# Altium PCB CH32H417QEU-R1.PcbDoc (part 2 of 6)
Units mil, origin at the board's own origin, x right, y up, seen from the top; angles counter-clockwise.
Board outline 4921.26 x 3346.46 mil, 4 copper layers (Top Layer, Layer 1, Layer 2, Bottom Layer), stack 23.756 mil thick; 271 components, 257 nets, 1065 pads, 927 vias.
Unrouted connection lines stored in the file: 149.
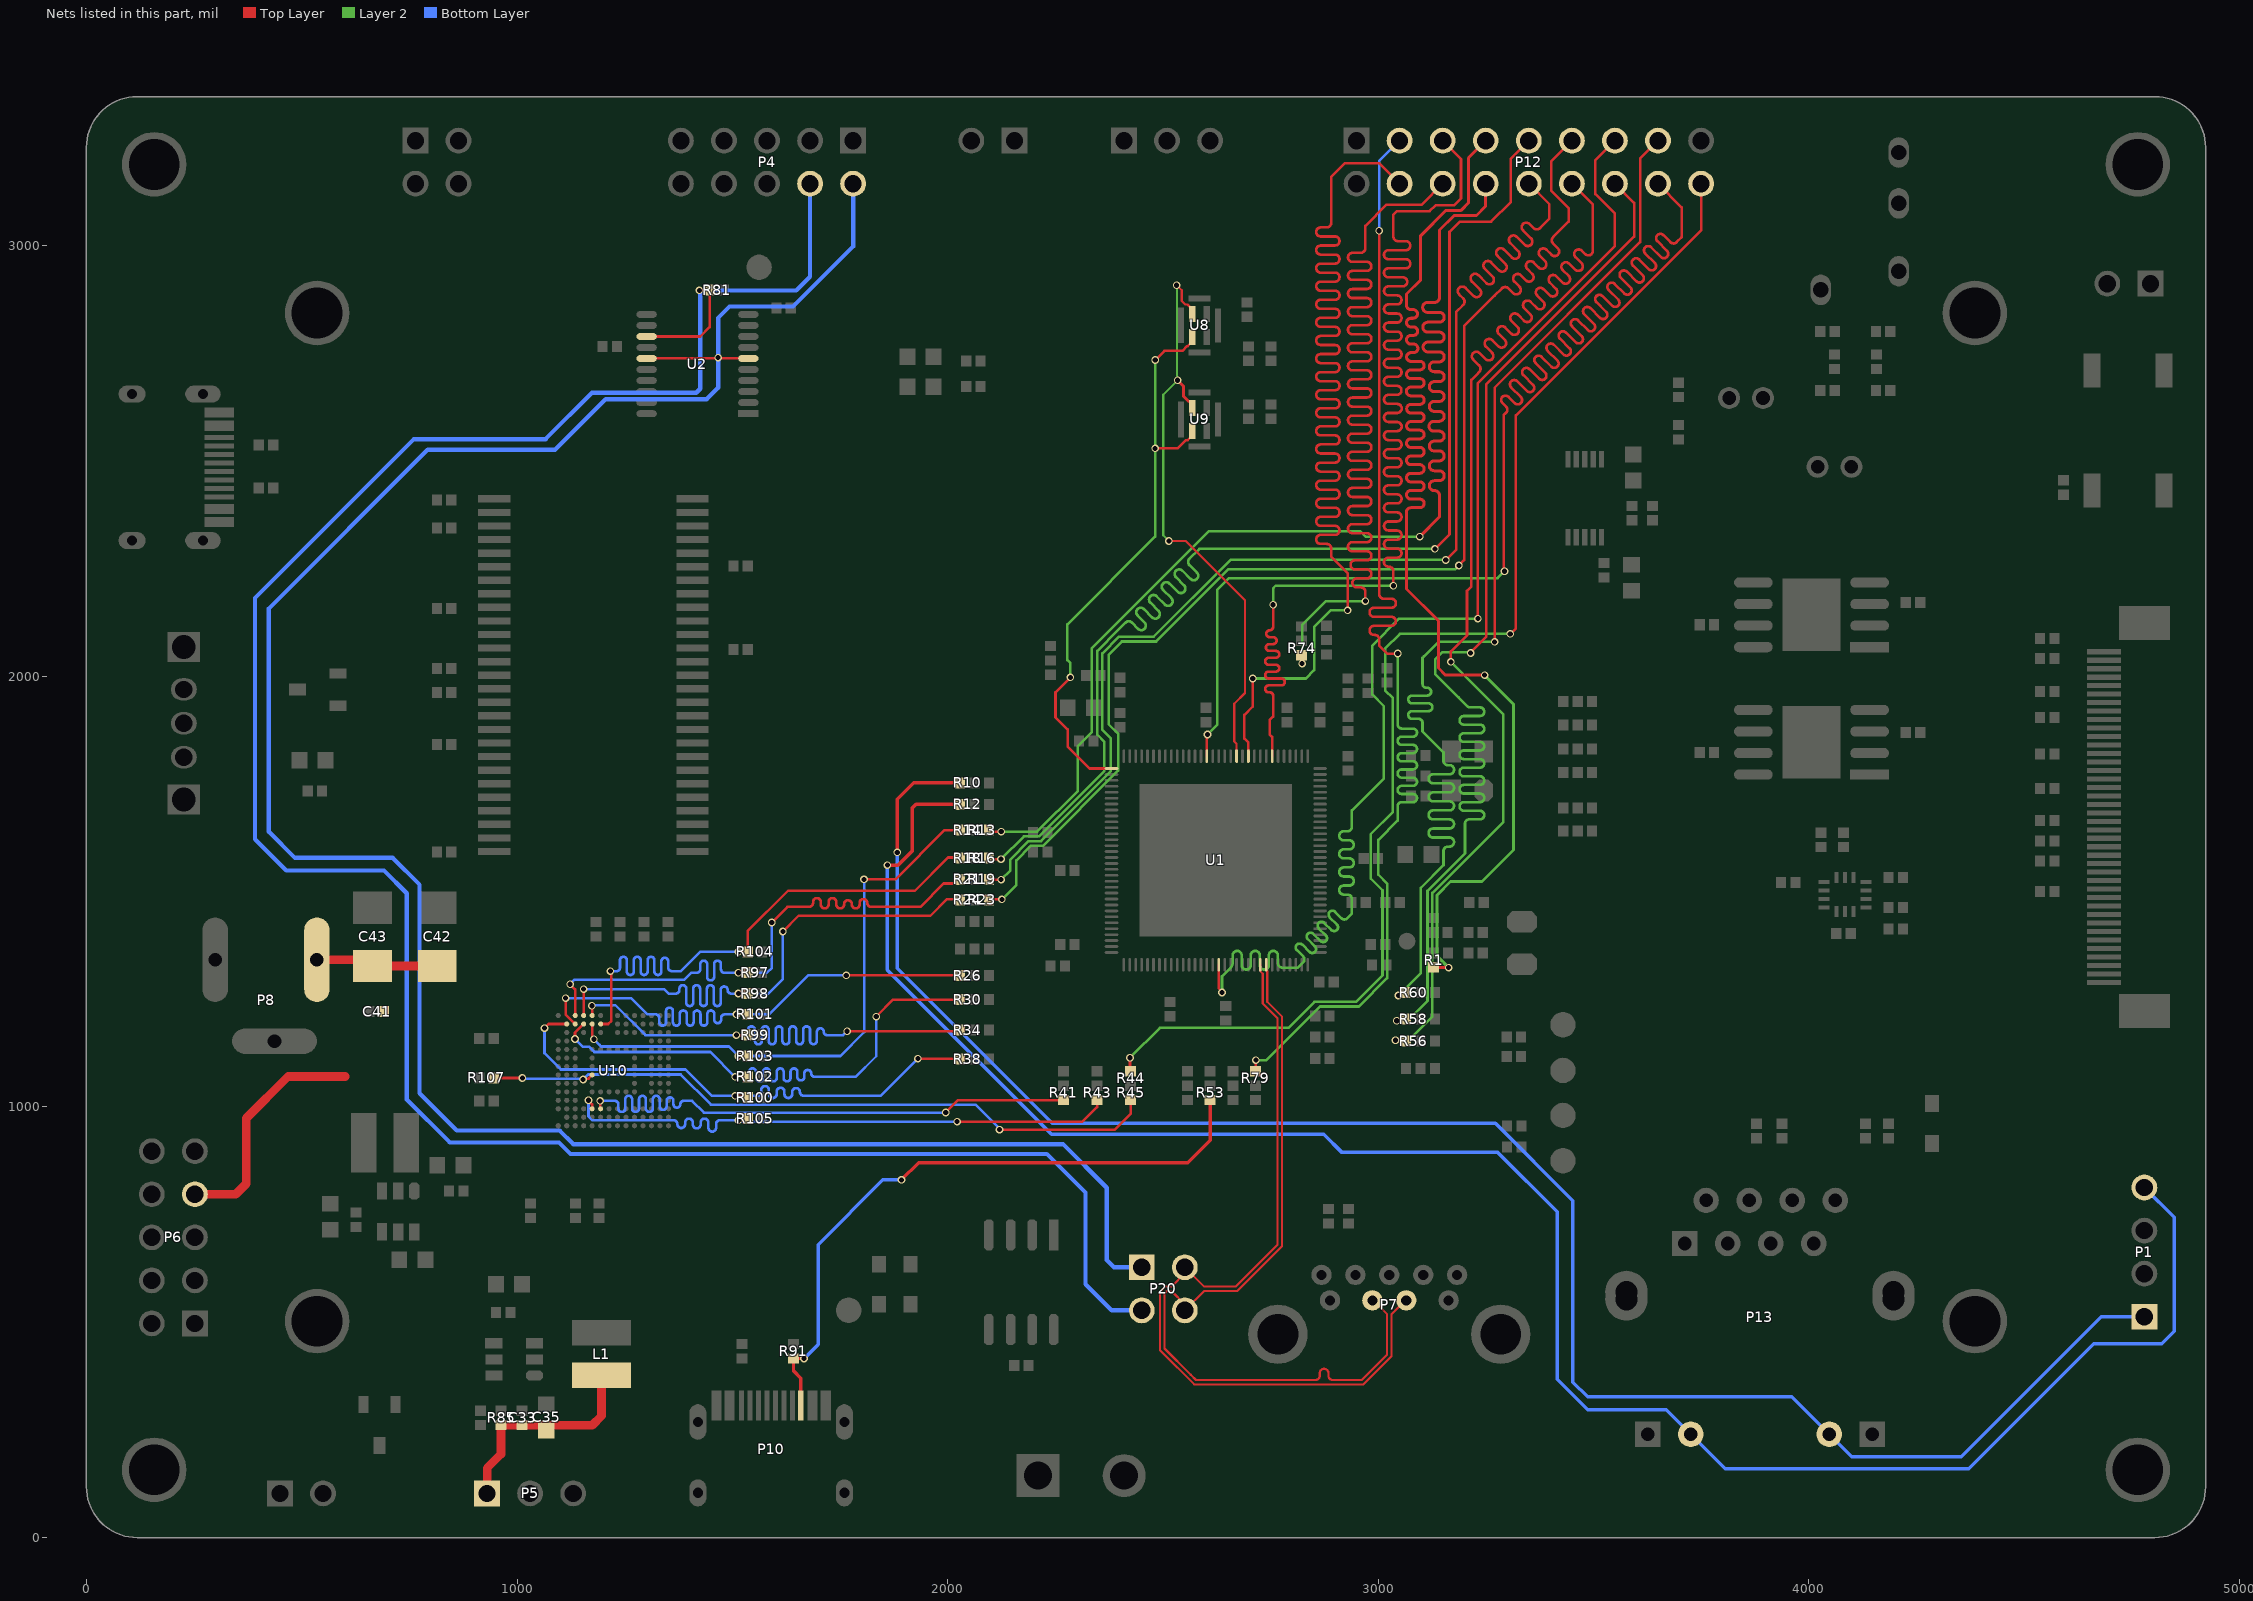
[diagram p4: the nets of this part, all layers, seen from the top]

## Via types
v1: diameter 17.72, hole 11.81, Top Layer to Bottom Layer, tented both sides, 558 vias
v2: diameter 19.68, hole 11.81, Top Layer to Bottom Layer, tented both sides, 320 vias
v3: diameter 28, hole 16, Top Layer to Bottom Layer, tented both sides, 24 vias
v4: diameter 20, hole 12, Top Layer to Bottom Layer, tented both sides, 22 vias
v5: diameter 27.56, hole 15.75, Top Layer to Bottom Layer, tented both sides, 3 vias

## Nets (pads, with @x,y where several pads share a name; then routed paths per layer and width w, separated by ;. In a path a pad name is that pad's centre, name@x,y a point inside that pad or via, vN(x,y) a via of type N, cw(c..) or ccw(c..) an arc to the next point about the centre after c; other vN are vias at no path point) (continued)
CC2: P10.B5 R53.1 R91.1 | length 1523
  Top Layer w8: P10.B5@1658.98,306.76 1658.98,370.51 1642,387.49 R91.1@1642,416 v1(1666.57,416) ; v1(1892.75,830.83) 1932.66,870.75 2557.72,870.75 2609.77,922.79 R53.1@2609.77,1016.02
  Bottom Layer w8: v1(1666.57,416) 1699.1,448.52 1699.1,680.41 1849.52,830.83 v1(1892.75,830.83)
CLK: P7.3 P20.2 U1.120 | length 1908.2
  Top Layer w5.1: U1.120@2726.04,1330.38 2726.26,1330.16 2726.26,1314.99 2731.87,1309.38 2731.87,1240.35 2766,1206.22 2766,680.24 2668.59,582.83 2595.75,582.83 P20.2@2550.8,627.78 2550.8,613.81 2519.83,582.83 2505.19,582.83 2496.39,574.02 2493.43,571.06 2493.43,435.15 2496.39,432.19 2572.7,355.88 2965.51,355.88 3030.68,421.05 3030.68,518.62 3063.06,551 P7.3@3065,551
D_SWCLK: P4.2 P20.1 U2.6 U2.15 | length 5528.4
  Top Layer w6: U2.15@1300.92,2738.17 1301.97,2739.22 1465.94,2739.22 v1(1466.99,2740.26) 1468.04,2739.22 1536.11,2739.22 U2.6@1537.16,2738.17
  Bottom Layer w10: P4.2@1780.53,3142.48 1780.53,2998.27 1641.01,2858.76 1493.56,2858.76 1466.99,2832.19 v1(1466.99,2740.26) 1466.99,2670.43 1440.28,2643.72 1205.74,2643.72 1088.31,2526.29 792.45,2526.29 423.71,2157.55 423.71,1639.18 484.43,1578.47 711.31,1578.47 773.42,1516.36 773.42,1032.04 859.96,945.5 1098.92,945.5 1130.64,913.78 2268.08,913.78 2369.57,812.29 2369.57,644.54 2386.33,627.78 P20.1@2450.8,627.78
D_SWDIO: P4.4 P20.3 R81.1 U2.13 | length 5690.4
  Top Layer w6: U2.13@1300.92,2789.27 1425.49,2789.26 1447.13,2810.88 R81.1@1447.13,2896.76 1446.68,2896.31 v1(1423.54,2896.31)
  Bottom Layer w10: P4.4@1680.53,3144.09 1680.53,2928.2 1648.64,2896.31 1425.5,2896.31 1425.5,2668.09 1416.17,2658.76 1174.27,2658.76 1066.44,2550.93 760.41,2550.93 391.33,2181.85 391.33,1621.98 464.19,1549.12 691.07,1549.12 744.04,1496.16 744.04,1017.59 844.01,917.62 1097.35,917.62 1123.98,890.99 2230.5,890.99 2320.15,801.34 2320.15,588.39 2380.76,527.78 P20.3@2450.8,527.78
DC_3V3: C33.1 C35.2 L1.2 P5.1 R85.1 | length 508.3
  Top Layer w20: P5.1@930.43,102.71 930.43,161.53 962.88,193.98 R85.1@962.88,261.16 C33.1@1012,261.16 1061.12,261.16 1174.59,261.16 1196.12,282.69 L1.2@1196.12,376.95
DC_5V: C41.2 C42.2 C43.2 P6.7 P8.1 | length 842
  Top Layer w20: P6.7@254.28,793.57 258.09,797.38 347.1,797.38 371.39,821.68 371.39,973.92 468.4,1070.93 600.9,1070.93 ; P8.1@535.24,1341.89 650.07,1341.89 C43.2@664.56,1327.4 C42.2@814.56,1327.4 819.06,1327.4 C42.2@820.08,1326.39
DFS_CLK: U1.45 U8.3 U9.3 | length 1387.9
  Top Layer w5: v1(2513.65,2314.42) 2552.78,2314.42 2690.34,2176.86 2690.34,1961.53 2665.59,1936.77 2665.59,1848.59 2670.92,1843.26 U1.45@2670.92,1814.64 ; v1(2531.87,2908.28) 2543.66,2896.49 2543.66,2871.86 2551.93,2863.6 2557.07,2863.6 2568.27,2852.4 U8.3@2568.27,2841.57
  Top Layer w7: v1(2533.98,2687.59) 2547.18,2674.38 2547.18,2651.33 2560.17,2638.35 2563.89,2638.35 2568.27,2633.98 U9.3@2568.27,2623.15
  Layer 2 w5: v1(2513.65,2314.42) 2500.68,2327.39 2500.68,2654.29 v1(2533.98,2687.59) 2532.93,2688.64 2532.93,2907.23 v1(2531.87,2908.28)
DFS_DOUT: U1.65 U8.4 U9.4 | length 1354.2
  Top Layer w6: v1(2285.02,1997.58) 2250.39,1962.95 2250.39,1905.03 2278.65,1876.76 2278.65,1837.16 2329.72,1786.09 U1.65@2380.56,1786.09 ; v1(2481.95,2529.44) 2534.1,2529.44 2553.13,2548.47 2557.57,2548.47 2568.27,2559.17 U9.4@2568.27,2570 ; v1(2482.18,2734.64) 2503.5,2755.97 2545.17,2755.97 2556.1,2766.9 2557.57,2766.9 2569.2,2778.53 U8.4@2569.2,2784.28
  Layer 2 w6: v1(2285.02,1997.58) 2285.02,2030.63 2278.12,2037.54 2278.12,2120.65 2481.95,2324.48 v1(2481.95,2529.44) ; v1@2482.06,2529.55 2482.06,2734.53 v1(2482.18,2734.64)
DIO: P7.2 P20.4 U1.121 | length 1908.2
  Top Layer w5.1: U1.121@2739.81,1330.38 2739.81,1317.46 2741.97,1315.3 2741.97,1244.54 2776.1,1210.41 2776.1,676.05 2672.78,572.73 2595.75,572.73 P20.4@2550.8,527.78 2550.8,541.75 2519.83,572.73 2509.38,572.73 2503.53,566.88 2503.53,439.34 2564.62,378.25 2576.88,365.98 2800.21,365.98 2854.12,365.98 ccw(c2854.12,376.03) 2864.17,376.03 2864.17,382.06 cw(c2874.22,382.06) 2884.27,382.06 2884.27,376.03 ccw(c2894.32,376.03) 2894.32,365.98 2916.97,365.98 2961.33,365.98 3020.58,425.23 3020.58,518.62 2988.2,551 P7.2@2986.26,551
DVP_D0: P12.8 R13.1 | length 2949.6
  Top Layer w6: R13.1@2095.96,1642.71 2099.28,1639.4 v1(2124.41,1639.4)
  Top Layer w7: v1(3096.28,2324.46) 3142.18,2370.37 3142.18,2416.4 3142.18,2419.9 ccw(c3130.68,2419.9) 3130.68,2431.4 3130.07,2431.4 cw(c3130.07,2442.9) 3130.07,2454.4 3141.75,2454.4 ccw(c3141.75,2465.9) 3141.75,2477.4 3130.07,2477.4 cw(c3130.07,2488.9) 3130.07,2500.4 3141.75,2500.4 ccw(c3141.75,2511.9) 3141.75,2523.4 3130.07,2523.4 cw(c3130.07,2534.9) 3130.07,2546.4 3141.75,2546.4 ccw(c3141.75,2557.9) 3141.75,2569.4 3129.51,2569.4 cw(c3129.51,2580.9) 3129.51,2592.4 3141.75,2592.4 ccw(c3141.75,2603.9) 3141.75,2615.4 3130.07,2615.4 cw(c3130.07,2626.9) 3130.07,2638.4 3141.75,2638.4 ccw(c3141.75,2649.9) 3141.75,2661.4 3130.07,2661.4 cw(c3130.07,2672.9) 3130.07,2684.4 3141.75,2684.4 ccw(c3141.75,2695.9) 3141.75,2707.4 3130.07,2707.4 cw(c3130.07,2718.9) 3130.07,2730.4 3141.75,2730.4 ccw(c3141.75,2741.9) 3141.75,2753.4 3115.5,2753.4 cw(c3115.5,2764.9) 3115.5,2776.4 3141.75,2776.4 ccw(c3141.75,2787.9) 3141.75,2799.4 3114.89,2799.4 cw(c3114.89,2810.9) 3114.89,2822.4 3141.75,2822.4 ccw(c3141.75,2833.9) 3141.75,2845.4 3114.54,2845.4 cw(c3114.54,2856.9) 3114.54,2868.4 3130.68,2868.4 ccw(c3130.68,2879.9) 3142.18,2879.9 3142.18,2926.78 3142.18,3036.34 3176.26,3070.42 3228.13,3070.42 3248.69,3090.98 P12.8@3248.69,3144.09
  Layer 2 w6: v1(2124.41,1639.4) 2207.62,1639.4 2302.39,1734.17 2302.39,1838.03 2334.82,1870.47 2334.82,2065.52 2606.11,2336.8 2958.31,2336.8 2970.65,2324.46 v1(3096.28,2324.46)
DVP_D1: P12.9 R16.1 | length 2977.8
  Top Layer w6: R16.1@2095.96,1577.71 2098.17,1575.5 v1(2123.99,1575.5) ; v1(3131.5,2296.11) 3165.33,2329.93 3165.33,3032.22 3189.28,3056.16 3262.28,3056.16 3307.89,3101.78 3307.89,3202.38 P12.9@3349.61,3244.09
  Layer 2 w6: v1(2123.99,1575.5) 2176.89,1628.4 2212.17,1628.4 2363.92,1780.15 2363.92,1848.04 2347.51,1864.45 2347.51,2059.27 2396.05,2107.82 2413.02,2124.79 cw(c2420.45,2117.36) 2427.87,2124.79 2442.19,2110.47 ccw(c2449.61,2117.9) 2457.04,2110.47 ccw(c2449.61,2117.9) 2457.04,2125.32 2441.04,2141.33 cw(c2448.46,2148.75) 2441.04,2156.17 cw(c2448.46,2148.75) 2455.89,2156.17 2474.86,2137.2 ccw(c2482.28,2144.63) 2489.71,2137.2 ccw(c2482.28,2144.63) 2489.71,2152.05 2470.73,2171.02 cw(c2478.16,2178.45) 2470.73,2185.87 cw(c2478.16,2178.45) 2485.58,2185.87 2504.56,2166.9 ccw(c2511.98,2174.32) 2519.41,2166.9 ccw(c2511.98,2174.32) 2519.41,2181.75 2500.43,2200.72 cw(c2507.86,2208.15) 2500.43,2215.57 cw(c2507.86,2208.15) 2515.28,2215.57 2534.26,2196.6 ccw(c2541.68,2204.02) 2549.1,2196.6 ccw(c2541.68,2204.02) 2549.1,2211.45 2530.13,2230.42 cw(c2537.56,2237.85) 2530.13,2245.27 cw(c2537.56,2237.85) 2544.98,2245.27 2563.95,2226.3 ccw(c2571.38,2233.72) 2578.8,2226.3 ccw(c2571.38,2233.72) 2578.8,2241.15 2561.52,2258.43 cw(c2568.94,2265.86) 2561.52,2273.28 2584.34,2296.11 2585.39,2296.11 2914.62,2296.11 v1(3131.5,2296.11)
DVP_D2: P12.10 R19.1 | length 2997.4
  Top Layer w6: R19.1@2095.96,1528.7 2096.55,1528.12 v1(2124.25,1528.12) ; v1(3156.78,2270.34) 3181.56,2295.13 3181.56,2846.99 3195.24,2860.67 3197.36,2862.79 ccw(c3189.94,2870.22) 3197.36,2877.64 3187.71,2887.29 cw(c3195.14,2894.72) 3187.71,2902.14 cw(c3195.14,2894.72) 3202.56,2902.14 3221.06,2883.65 ccw(c3228.48,2891.07) 3235.9,2883.65 ccw(c3228.48,2891.07) 3235.9,2898.5 3217.41,2916.99 cw(c3224.84,2924.42) 3217.41,2931.84 cw(c3224.84,2924.42) 3232.26,2931.84 3250.75,2913.35 ccw(c3258.18,2920.77) 3265.6,2913.35 ccw(c3258.18,2920.77) 3265.6,2928.2 3247.11,2946.69 cw(c3254.54,2954.11) 3247.11,2961.54 cw(c3254.54,2954.11) 3261.96,2961.54 3280.45,2943.05 ccw(c3287.88,2950.47) 3295.3,2943.05 ccw(c3287.88,2950.47) 3295.3,2957.9 3276.81,2976.39 cw(c3284.23,2983.81) 3276.81,2991.24 cw(c3284.23,2983.81) 3291.66,2991.24 3310.15,2972.74 ccw(c3317.58,2980.17) 3325,2972.74 ccw(c3317.58,2980.17) 3325,2987.59 3306.51,3006.09 cw(c3313.93,3013.51) 3306.51,3020.94 cw(c3313.93,3013.51) 3321.36,3020.94 3339.85,3002.44 ccw(c3347.27,3009.87) 3354.7,3002.44 ccw(c3347.27,3009.87) 3354.7,3017.29 3336.21,3035.78 cw(c3343.63,3043.21) 3336.21,3050.63 cw(c3343.63,3043.21) 3351.06,3050.63 3360.71,3040.98 ccw(c3368.13,3048.41) 3375.56,3040.98 3397.35,3062.78 3397.35,3096.35 P12.10@3349.61,3144.09
  Layer 2 w6: v1(2124.25,1528.12) 2145.5,1549.37 2145.5,1574.62 2188.28,1617.4 2216.73,1617.4 2379.22,1779.89 2379.22,1856.03 2359.47,1875.78 2359.47,2053.26 2398.27,2092.05 2478.6,2092.05 2657.15,2270.6 3156.52,2270.6 v1(3156.78,2270.34)
DVP_D3: P12.11 R23.1 | length 2988.9
  Top Layer w6: R23.1@2095.96,1481.08 2097.16,1482.28 v1(2125.96,1482.28) ; v1(3187.24,2257.53) 3199.56,2269.86 3199.56,2813.46 3270.23,2884.12 3287.2,2901.09 cw(c3294.62,2893.67) 3302.05,2901.09 3313.06,2890.08 ccw(c3320.48,2897.5) 3327.91,2890.08 ccw(c3320.48,2897.5) 3327.91,2904.93 3316.34,2916.49 cw(c3323.77,2923.92) 3316.34,2931.34 cw(c3323.77,2923.92) 3331.19,2931.34 3342.76,2919.78 ccw(c3350.18,2927.2) 3357.61,2919.78 ccw(c3350.18,2927.2) 3357.61,2934.63 3346.04,2946.19 cw(c3353.46,2953.62) 3346.04,2961.04 cw(c3353.46,2953.62) 3360.89,2961.04 3372.45,2949.48 ccw(c3379.88,2956.9) 3387.3,2949.48 ccw(c3379.88,2956.9) 3387.3,2964.33 3375.74,2975.89 cw(c3383.16,2983.31) 3375.74,2990.74 cw(c3383.16,2983.31) 3390.59,2990.74 3402.15,2979.17 ccw(c3409.58,2986.6) 3417,2979.17 ccw(c3409.58,2986.6) 3417,2994.02 3405.99,3005.04 cw(c3413.41,3012.46) 3405.99,3019.89 3441.93,3055.82 3441.93,3087.48 3401.81,3127.6 3401.81,3196.3 P12.11@3449.61,3244.09
  Layer 2 w6: v1(2125.96,1482.28) 2159.36,1515.69 2159.36,1572.93 2192.83,1606.4 2221.28,1606.4 2395.83,1780.94 2395.83,1866.83 2373.81,1888.84 2373.81,2050.11 2404.75,2081.05 2483.99,2081.05 2651.24,2248.3 3178.01,2248.3 v1(3187.24,2257.53)
DVP_D4: P12.12 R56.1 | length 2916.3
  Top Layer w6: v1(3039.98,1154.96) 3062.6,1154.96 R56.1@3064.72,1152.84 ; v1(3168.68,2033.68) 3168.68,2057.82 3206.14,2095.27 3206.14,2198.52 3216.09,2208.47 3216.09,2688.66 3232.35,2704.93 3234.48,2707.05 ccw(c3227.05,2714.48) 3234.48,2721.9 3220.47,2735.91 cw(c3227.89,2743.34) 3220.47,2750.76 cw(c3227.89,2743.34) 3235.32,2750.76 3249.35,2736.72 ccw(c3256.78,2744.15) 3264.2,2736.72 ccw(c3256.78,2744.15) 3264.2,2751.57 3250.16,2765.61 cw(c3257.59,2773.03) 3250.16,2780.46 cw(c3257.59,2773.03) 3265.01,2780.46 3279.05,2766.42 ccw(c3286.48,2773.85) 3293.9,2766.42 ccw(c3286.48,2773.85) 3293.9,2781.27 3279.86,2795.31 cw(c3287.29,2802.73) 3279.86,2810.16 cw(c3287.29,2802.73) 3294.71,2810.16 3308.75,2796.12 ccw(c3316.17,2803.54) 3323.6,2796.12 ccw(c3316.17,2803.54) 3323.6,2810.97 3309.56,2825.01 cw(c3316.99,2832.43) 3309.56,2839.86 cw(c3316.99,2832.43) 3324.41,2839.86 3338.45,2825.82 ccw(c3345.87,2833.24) 3353.3,2825.82 ccw(c3345.87,2833.24) 3353.3,2840.67 3339.26,2854.7 cw(c3346.68,2862.13) 3339.26,2869.55 cw(c3346.68,2862.13) 3354.11,2869.55 3368.15,2855.52 ccw(c3375.57,2862.94) 3383,2855.52 ccw(c3375.57,2862.94) 3383,2870.37 3368.96,2884.4 cw(c3376.38,2891.83) 3368.96,2899.25 cw(c3376.38,2891.83) 3383.81,2899.25 3397.85,2885.21 ccw(c3405.27,2892.64) 3412.69,2885.21 ccw(c3405.27,2892.64) 3412.69,2900.06 3398.66,2914.1 cw(c3406.08,2921.53) 3398.66,2928.95 cw(c3406.08,2921.53) 3413.51,2928.95 3427.54,2914.91 ccw(c3434.97,2922.34) 3442.39,2914.91 ccw(c3434.97,2922.34) 3442.39,2929.76 3428.36,2943.8 cw(c3435.78,2951.22) 3428.36,2958.65 cw(c3435.78,2951.22) 3443.2,2958.65 3457.24,2944.61 ccw(c3464.67,2952.04) 3472.09,2944.61 ccw(c3464.67,2952.04) 3472.09,2959.46 3458.05,2973.5 cw(c3465.48,2980.92) 3458.05,2988.35 cw(c3465.48,2980.92) 3472.9,2988.35 3480.51,2980.74 ccw(c3487.94,2988.16) 3498.44,2988.16 3498.44,3019.53 3498.44,3095.27 P12.12@3440.43,3153.27
  Layer 2 w6: v1(3039.98,1154.96) 3070.46,1154.96 3125.4,1209.91 3125.4,1497.29 3290.39,1662.27 3290.39,1911.97 v1(3168.68,2033.68)
DVP_D5: P12.13 U1.113 | length 3338.1
  Top Layer w6: U1.113@2629.58,1330.38 2629.58,1275.46 2637.2,1267.84 v1(2637.2,1265.98) ; v1(3231.22,2133.98) 3230.9,2134.3 3230.9,2207.73 3231.27,2208.1 3231.27,2681.12 3549.61,2999.45 3549.61,3074.47 3504.16,3119.92 3504.16,3198.65 P12.13@3549.61,3244.09
  Layer 2 w6: v1(2637.2,1265.98) 2637.2,1303.28 2653.57,1319.64 2656.57,1322.64 ccw(c2643.9,1335.32) 2661.82,1335.32 2661.82,1352.06 cw(c2672.32,1352.06) 2682.82,1352.06 2682.82,1329.68 ccw(c2693.32,1329.68) 2703.82,1329.68 2703.82,1352.06 cw(c2714.32,1352.06) 2724.82,1352.06 2724.82,1329.68 ccw(c2735.32,1329.68) 2745.82,1329.68 2745.82,1352.06 cw(c2756.32,1352.06) 2766.82,1352.06 2766.82,1334.19 ccw(c2777.32,1334.19) 2777.32,1323.69 2791.2,1323.69 2813.32,1323.69 2823.8,1334.17 2825.92,1336.29 ccw(c2819.56,1342.65) 2825.92,1349.02 2810.84,1364.1 cw(c2817.2,1370.46) 2810.84,1376.82 cw(c2817.2,1370.46) 2823.57,1376.82 2840.31,1360.08 ccw(c2846.67,1366.45) 2853.04,1360.08 ccw(c2846.67,1366.45) 2853.04,1372.81 2836.3,1389.55 cw(c2842.66,1395.92) 2836.3,1402.28 cw(c2842.66,1395.92) 2849.02,1402.28 2865.76,1385.54 ccw(c2872.13,1391.9) 2878.49,1385.54 ccw(c2872.13,1391.9) 2878.49,1398.27 2861.75,1415.01 cw(c2868.12,1421.37) 2861.75,1427.74 cw(c2868.12,1421.37) 2874.48,1427.74 2891.22,1411 ccw(c2897.58,1417.36) 2903.95,1411 ccw(c2897.58,1417.36) 2903.95,1423.72 2887.21,1440.46 cw(c2893.57,1446.83) 2887.21,1453.19 cw(c2893.57,1446.83) 2899.94,1453.19 2915.01,1438.11 ccw(c2921.38,1444.48) 2927.74,1438.11 2936.98,1447.35 2938.89,1449.26 2938.89,1479.79 2938.89,1482.79 ccw(c2928.39,1482.79) 2928.39,1493.29 2919.79,1493.29 cw(c2919.79,1503.79) 2919.79,1514.29 2932.74,1514.29 ccw(c2932.74,1524.79) 2932.74,1535.29 2919.79,1535.29 cw(c2919.79,1545.79) 2919.79,1556.29 2932.74,1556.29 ccw(c2932.74,1566.79) 2932.74,1577.29 2919.79,1577.29 cw(c2919.79,1587.79) 2919.79,1598.29 2932.74,1598.29 ccw(c2932.74,1608.79) 2932.74,1619.29 2919.79,1619.29 cw(c2919.79,1629.79) 2919.79,1640.29 2928.39,1640.29 ccw(c2928.39,1650.79) 2938.89,1650.79 2938.89,1681.02 2938.89,1688.55 3013.01,1762.67 3013.01,1930.61 2986.18,1957.45 2986.18,2071.54 3048.62,2133.98 v1(3231.22,2133.98)
DVP_D6: P12.14 R58.1 | length 2982.5
  Top Layer w6: v1(3042.96,1200.32) 3061.18,1200.32 R58.1@3064.72,1203.86 ; v1(3214.46,2054.2) 3214.46,2055.77 3250.34,2091.66 3250.34,2677.32 3594.41,3021.4 3594.41,3099.29 P12.14@3549.61,3144.09
  Layer 2 w6: v1(3042.96,1200.32) 3068.45,1200.32 3114.4,1246.28 3114.4,1501.84 3201.35,1588.79 3201.35,1634.95 3201.35,1657.95 cw(c3211.35,1657.95) 3211.35,1667.95 3236.06,1667.95 ccw(c3236.06,1677.95) 3236.06,1687.95 3198.84,1687.95 cw(c3198.84,1697.95) 3198.84,1707.95 3236.06,1707.95 ccw(c3236.06,1717.95) 3236.06,1727.95 3198.84,1727.95 cw(c3198.84,1737.95) 3198.84,1747.95 3236.06,1747.95 ccw(c3236.06,1757.95) 3236.06,1767.95 3198.84,1767.95 cw(c3198.84,1777.95) 3198.84,1787.95 3236.06,1787.95 ccw(c3236.06,1797.95) 3236.06,1807.95 3198.84,1807.95 cw(c3198.84,1817.95) 3198.84,1827.95 3236.06,1827.95 ccw(c3236.06,1837.95) 3236.06,1847.95 3198.84,1847.95 cw(c3198.84,1857.95) 3198.84,1867.95 3236.06,1867.95 ccw(c3236.06,1877.95) 3236.06,1887.95 3198.84,1887.95 cw(c3198.84,1897.95) 3198.84,1907.95 3236.06,1907.95 ccw(c3236.06,1917.95) 3236.06,1927.95 3213.51,1927.95 cw(c3213.51,1937.95) 3206.44,1930.88 3186.24,1951.07 3131.94,2005.37 3131.94,2039.47 3148.22,2055.75 3212.91,2055.75 v1(3214.46,2054.2)
DVP_D7: P12.15 R60.1 | length 2983.4
  Top Layer w6: v1(3046.83,1258.93) 3058.02,1258.93 R60.1@3064.72,1265.63 ; v1(3270.15,2080.05) 3270.15,2670.25 3608.28,3008.38 3608.28,3202.77 P12.15@3649.61,3244.09
  Layer 2 w6: v1(3046.83,1258.93) 3099.13,1311.23 3099.13,1509.16 3151.43,1561.45 3151.43,1570.25 3151.43,1594.25 cw(c3161.93,1594.25) 3161.93,1604.75 3165.59,1604.75 ccw(c3165.59,1615.25) 3165.59,1625.75 3127.49,1625.75 cw(c3127.49,1636.25) 3127.49,1646.75 3165.59,1646.75 ccw(c3165.59,1657.25) 3165.59,1667.75 3127.49,1667.75 cw(c3127.49,1678.25) 3127.49,1688.75 3165.59,1688.75 ccw(c3165.59,1699.25) 3165.59,1709.75 3127.49,1709.75 cw(c3127.49,1720.25) 3127.49,1730.75 3165.59,1730.75 ccw(c3165.59,1741.25) 3165.59,1751.75 3127.49,1751.75 cw(c3127.49,1762.25) 3127.49,1772.75 3165.59,1772.75 ccw(c3165.59,1783.25) 3165.59,1793.75 3161.93,1793.75 cw(c3161.93,1804.25) 3151.43,1804.25 3151.43,1823.76 3102.76,1872.42 3102.76,1889.39 3102.76,1892.39 ccw(c3093.76,1892.39) 3093.76,1901.39 3078.79,1901.39 cw(c3078.79,1910.39) 3078.79,1919.39 3116.78,1919.39 ccw(c3116.78,1928.39) 3116.78,1937.39 3078.79,1937.39 cw(c3078.79,1946.39) 3078.79,1955.39 3113.75,1955.39 ccw(c3113.75,1964.39) 3113.75,1973.39 3111.76,1973.39 cw(c3111.76,1982.39) 3102.76,1982.39 3102.76,2042.88 3106.23,2046.35 3139.93,2080.05 v1(3270.15,2080.05)
DVP_HSYNC: P12.5 U1.39 | length 3341.3
  Top Layer w6: U1.39@2753.59,1814.64 2753.59,1859.7 2747.84,1865.46 2747.84,1898.63 2755.9,1906.69 2755.9,1952.03 2755.9,1955.03 ccw(c2747.9,1955.03) 2747.9,1963.03 2745.39,1963.03 cw(c2745.39,1971.03) 2745.39,1979.03 2774.88,1979.03 ccw(c2774.88,1987.03) 2774.88,1995.03 2745.39,1995.03 cw(c2745.39,2003.03) 2745.39,2011.03 2762.09,2011.03 ccw(c2762.09,2019.03) 2762.09,2027.03 2745.39,2027.03 cw(c2745.39,2035.03) 2745.39,2043.03 2762.09,2043.03 ccw(c2762.09,2051.03) 2762.09,2059.03 2746.97,2059.03 cw(c2746.97,2067.03) 2746.97,2075.03 2755.91,2075.03 ccw(c2755.91,2083.03) 2755.91,2091.03 2747.9,2091.03 cw(c2747.9,2099.03) 2747.9,2107.03 ccw(c2747.9,2115.03) 2755.9,2115.03 2755.9,2135.22 2755.9,2166.33 v1(2755.83,2166.4) ; v1(3035.11,2210.46) 3035.11,2241.21 3035.11,2244.21 ccw(c3024.61,2244.21) 3024.61,2254.71 3023.82,2254.71 cw(c3023.82,2265.21) 3023.82,2275.71 3043.6,2275.71 ccw(c3043.6,2286.21) 3043.6,2296.71 3023.82,2296.71 cw(c3023.82,2307.21) 3023.82,2317.71 3043.6,2317.71 ccw(c3043.6,2328.21) 3043.6,2338.71 3023.82,2338.71 cw(c3023.82,2349.21) 3023.82,2359.71 3043.6,2359.71 ccw(c3043.6,2370.21) 3043.6,2380.71 3023.82,2380.71 cw(c3023.82,2391.21) 3023.82,2401.71 3043.6,2401.71 ccw(c3043.6,2412.21) 3043.6,2422.71 3023.82,2422.71 cw(c3023.82,2433.21) 3023.82,2443.71 3043.6,2443.71 ccw(c3043.6,2454.21) 3043.6,2464.71 3023.82,2464.71 cw(c3023.82,2475.21) 3023.82,2485.71 3043.6,2485.71 ccw(c3043.6,2496.21) 3043.6,2506.71 3023.82,2506.71 cw(c3023.82,2517.21) 3023.82,2527.71 3043.6,2527.71 ccw(c3043.6,2538.21) 3043.6,2548.71 3023.82,2548.71 cw(c3023.82,2559.21) 3023.82,2569.71 3043.81,2569.71 ccw(c3043.81,2580.21) 3043.81,2590.71 3023.82,2590.71 cw(c3023.82,2601.21) 3023.82,2611.71 3043.91,2611.71 ccw(c3043.91,2622.21) 3043.91,2632.71 3023.82,2632.71 cw(c3023.82,2643.21) 3023.82,2653.71 3043.31,2653.71 ccw(c3043.31,2664.21) 3043.31,2674.71 3023.82,2674.71 cw(c3023.82,2685.21) 3023.82,2695.71 3043.57,2695.71 ccw(c3043.57,2706.21) 3043.57,2716.71 3023.82,2716.71 cw(c3023.82,2727.21) 3023.82,2737.71 3043.6,2737.71 ccw(c3043.6,2748.21) 3043.6,2758.71 3023.82,2758.71 cw(c3023.82,2769.21) 3023.82,2779.71 3043.6,2779.71 ccw(c3043.6,2790.21) 3043.6,2800.71 3023.82,2800.71 cw(c3023.82,2811.21) 3023.82,2821.71 3043.6,2821.71 ccw(c3043.6,2832.21) 3043.6,2842.71 3023.82,2842.71 cw(c3023.82,2853.21) 3023.82,2863.71 3043.6,2863.71 ccw(c3043.6,2874.21) 3043.6,2884.71 3023.82,2884.71 cw(c3023.82,2895.21) 3023.82,2905.71 3056.84,2905.71 ccw(c3056.84,2916.21) 3056.84,2926.71 3023.82,2926.71 cw(c3023.82,2937.21) 3023.82,2947.71 3063.94,2947.71 ccw(c3063.94,2958.21) 3063.94,2968.71 3023.82,2968.71 cw(c3023.82,2979.21) 3023.82,2989.71 3063.94,2989.71 ccw(c3063.94,3000.21) 3063.94,3010.71 3045.61,3010.71 cw(c3045.61,3021.21) 3035.11,3021.21 3035.11,3065.42 3035.11,3072.13 3043.24,3080.26 3119.38,3080.26 3133.04,3093.92 3176.12,3093.92 3192.19,3109.98 3192.19,3201.51 P12.5@3149.61,3244.09
  Layer 2 w6: v1(2755.83,2166.4) 2755.83,2204.61 2761.68,2210.46 v1(3035.11,2210.46)
DVP_PCLK: P12.16 U1.50 | length 3341.1
  Top Layer w6: U1.50@2602.02,1814.64 2602.02,1863.61 v1(2603.5,1865.09) ; v1(3293.24,2244.2) 3291.17,2246.28 3291.17,2606.63 3294.69,2610.15 3296.81,2612.27 ccw(c3289.74,2619.34) 3296.81,2626.41 3288.22,2635 cw(c3295.29,2642.07) 3288.22,2649.14 cw(c3295.29,2642.07) 3302.37,2649.14 3316.88,2634.63 ccw(c3323.95,2641.7) 3331.02,2634.63 ccw(c3323.95,2641.7) 3331.02,2648.77 3308.69,2671.1 cw(c3315.76,2678.17) 3308.69,2685.24 cw(c3315.76,2678.17) 3322.83,2685.24 3345.16,2662.91 ccw(c3352.23,2669.99) 3359.31,2662.91 ccw(c3352.23,2669.99) 3359.3,2677.06 3336.98,2699.39 cw(c3344.05,2706.46) 3336.98,2713.53 cw(c3344.05,2706.46) 3351.12,2713.53 3373.45,2691.2 ccw(c3380.52,2698.27) 3387.59,2691.2 ccw(c3380.52,2698.27) 3387.59,2705.34 3365.26,2727.67 cw(c3372.33,2734.74) 3365.26,2741.81 cw(c3372.33,2734.74) 3379.4,2741.81 3401.73,2719.48 ccw(c3408.8,2726.55) 3415.87,2719.48 ccw(c3408.8,2726.55) 3415.87,2733.63 3393.54,2755.96 cw(c3400.61,2763.03) 3393.54,2770.1 cw(c3400.61,2763.03) 3407.69,2770.1 3430.02,2747.77 ccw(c3437.09,2754.84) 3444.16,2747.77 ccw(c3437.09,2754.84) 3444.16,2761.91 3421.83,2784.24 cw(c3428.9,2791.31) 3421.83,2798.38 cw(c3428.9,2791.31) 3435.97,2798.38 3458.3,2776.05 ccw(c3465.37,2783.12) 3472.44,2776.05 ccw(c3465.37,2783.12) 3472.44,2790.19 3450.11,2812.52 cw(c3457.18,2819.59) 3450.11,2826.67 cw(c3457.18,2819.59) 3464.25,2826.67 3486.58,2804.34 ccw(c3493.66,2811.41) 3500.73,2804.34 ccw(c3493.66,2811.41) 3500.73,2818.48 3478.4,2840.81 cw(c3485.47,2847.88) 3478.4,2854.95 cw(c3485.47,2847.88) 3492.54,2854.95 3514.87,2832.62 ccw(c3521.94,2839.69) 3529.01,2832.62 ccw(c3521.94,2839.69) 3529.01,2846.76 3506.68,2869.09 cw(c3513.75,2876.16) 3506.68,2883.23 cw(c3513.75,2876.16) 3520.82,2883.23 3543.15,2860.9 ccw(c3550.22,2867.98) 3557.29,2860.9 ccw(c3550.22,2867.98) 3557.29,2875.05 3534.97,2897.38 cw(c3542.04,2904.45) 3534.97,2911.52 cw(c3542.04,2904.45) 3549.11,2911.52 3571.44,2889.19 ccw(c3578.51,2896.26) 3585.58,2889.19 ccw(c3578.51,2896.26) 3585.58,2903.33 3563.25,2925.66 cw(c3570.32,2932.73) 3563.25,2939.8 cw(c3570.32,2932.73) 3577.39,2939.8 3599.72,2917.47 ccw(c3606.79,2924.54) 3613.86,2917.47 ccw(c3606.79,2924.54) 3613.86,2931.62 3591.53,2953.94 cw(c3598.6,2961.02) 3591.53,2968.09 cw(c3598.6,2961.02) 3605.68,2968.09 3628.01,2945.76 ccw(c3635.08,2952.83) 3642.15,2945.76 ccw(c3635.08,2952.83) 3642.15,2959.9 3619.82,2982.23 cw(c3626.89,2989.3) 3619.82,2996.37 cw(c3626.89,2989.3) 3633.96,2996.37 3656.29,2974.04 ccw(c3663.36,2981.11) 3670.43,2974.04 ccw(c3663.36,2981.11) 3670.43,2988.18 3648.1,3010.51 cw(c3655.17,3017.58) 3648.1,3024.66 cw(c3655.17,3017.58) 3662.24,3024.66 3678.65,3008.25 ccw(c3685.72,3015.32) 3692.79,3008.25 3703.61,3019.07 3704.54,3020 3704.54,3089.16 P12.16@3649.61,3144.09
  Layer 2 w6: v1(2603.5,1865.09) 2625.99,1887.58 2625.99,2200.83 2653.48,2228.32 3277.36,2228.32 v1(3293.24,2244.2)
DVP_PWDN: P12.18 R44.1 | length 3030.2
  Top Layer w6: v1(2423.4,1114.42) 2423.4,1084.49 R44.1@2424.94,1082.95 ; v1(3306.51,2098.62) 3319.39,2111.5 3319.39,2605.74 3749.61,3035.96 P12.18@3749.61,3144.09
  Layer 2 w6: v1(2423.4,1114.42) 2492.83,1183.85 2791.06,1183.85 2851.52,1244.3 2948.19,1244.3 3009.78,1305.89 3009.78,1503.31 2982.57,1530.52 2982.57,1633.85 3034.01,1685.29 3034.01,1949.48 3015.9,1967.6 3015.9,2064.45 3050.06,2098.62 3238.3,2098.62 v1(3306.51,2098.62)
DVP_RESET: P12.7 R1.1 | length 3030.4
  Top Layer w7: R1.1@3128.37,1323.52 v1(3163.36,1323.52) ; v1(3246.93,2002.79) 3156.23,2002.79 3139.64,2019.37 3139.64,2128.93 3065.6,2202.98 3065.6,2318.15 3065.6,2381.65 cw(c3075.6,2381.65) 3075.6,2391.65 3096.57,2391.65 ccw(c3096.57,2401.65) 3096.57,2411.65 3075.6,2411.65 cw(c3075.6,2421.65) 3075.6,2431.65 3096.57,2431.65 ccw(c3096.57,2441.65) 3096.57,2451.65 3075.6,2451.65 cw(c3075.6,2461.65) 3075.6,2471.65 3096.57,2471.65 ccw(c3096.57,2481.65) 3096.57,2491.65 3075.6,2491.65 cw(c3075.6,2501.65) 3075.6,2511.65 3096.57,2511.65 ccw(c3096.57,2521.65) 3096.57,2531.65 3075.6,2531.65 cw(c3075.6,2541.65) 3075.6,2551.65 3096.57,2551.65 ccw(c3096.57,2561.65) 3096.57,2571.65 3075.81,2571.65 cw(c3075.81,2581.65) 3075.81,2591.65 3096.57,2591.65 ccw(c3096.57,2601.65) 3096.57,2611.65 3075.91,2611.65 cw(c3075.91,2621.65) 3075.91,2631.65 3096.57,2631.65 ccw(c3096.57,2641.65) 3096.57,2651.65 3075.31,2651.65 cw(c3075.31,2661.65) 3075.31,2671.65 3096.57,2671.65 ccw(c3096.57,2681.65) 3096.57,2691.65 3075.57,2691.65 cw(c3075.57,2701.65) 3075.57,2711.65 3096.57,2711.65 ccw(c3096.57,2721.65) 3096.57,2731.65 3075.6,2731.65 cw(c3075.6,2741.65) 3075.6,2751.65 3082,2751.65 ccw(c3082,2761.65) 3082,2771.65 3075.6,2771.65 cw(c3075.6,2781.65) 3075.6,2791.65 3081.39,2791.65 ccw(c3081.39,2801.65) 3081.39,2811.65 3075.6,2811.65 cw(c3075.6,2821.65) 3075.6,2831.65 3081.04,2831.65 ccw(c3081.04,2841.65) 3081.04,2851.65 3075.6,2851.65 cw(c3075.6,2861.65) 3065.6,2861.65 3065.6,2886.52 3065.6,2887.7 3098.55,2920.65 3098.55,3023.53 3157.44,3082.42 3192.53,3082.42 3209.71,3099.59 3209.71,3204.2 P12.7@3255.95,3250.44
  Layer 2 w7: v1(3163.36,1323.52) 3136.9,1349.98 3136.9,1492.52 3168,1523.62 3240.81,1523.62 3313.91,1596.71 3313.91,1935.46 3246.93,2002.44 v1(3246.93,2002.79)
DVP_SCL: P12.4 U1.43 | length 3341.2
  Top Layer w6: U1.43@2698.48,1814.64 2698.48,1846.1 2689.25,1855.34 2689.25,1910.63 2708.53,1929.91 v1(2708.53,1995.08) ; v1(2928.87,2153.21) 2928.87,2239.77 2890.7,2277.94 2890.7,2294.06 2890.7,2297.06 ccw(c2880.2,2297.06) 2880.2,2307.56 2866.35,2307.56 cw(c2866.35,2318.06) 2866.35,2328.56 2899.61,2328.56 ccw(c2899.61,2339.06) 2899.61,2349.56 2866.35,2349.56 cw(c2866.35,2360.06) 2866.35,2370.56 2899.61,2370.56 ccw(c2899.61,2381.06) 2899.61,2391.56 2866.35,2391.56 cw(c2866.35,2402.06) 2866.35,2412.56 2899.61,2412.56 ccw(c2899.61,2423.06) 2899.61,2433.56 2866.35,2433.56 cw(c2866.35,2444.06) 2866.35,2454.56 2899.61,2454.56 ccw(c2899.61,2465.06) 2899.61,2475.56 2866.35,2475.56 cw(c2866.35,2486.06) 2866.35,2496.56 2899.61,2496.56 ccw(c2899.61,2507.06) 2899.61,2517.56 2866.35,2517.56 cw(c2866.35,2528.06) 2866.35,2538.56 2899.61,2538.56 ccw(c2899.61,2549.06) 2899.61,2559.56 2866.35,2559.56 cw(c2866.35,2570.06) 2866.35,2580.56 2899.61,2580.56 ccw(c2899.61,2591.06) 2899.61,2601.56 2866.35,2601.56 cw(c2866.35,2612.06) 2866.35,2622.56 2899.61,2622.56 ccw(c2899.61,2633.06) 2899.61,2643.56 2866.35,2643.56 cw(c2866.35,2654.06) 2866.35,2664.56 2899.61,2664.56 ccw(c2899.61,2675.06) 2899.61,2685.56 2866.35,2685.56 cw(c2866.35,2696.06) 2866.35,2706.56 2899.61,2706.56 ccw(c2899.61,2717.06) 2899.61,2727.56 2866.35,2727.56 cw(c2866.35,2738.06) 2866.35,2748.56 2899.61,2748.56 ccw(c2899.61,2759.06) 2899.61,2769.56 2866.35,2769.56 cw(c2866.35,2780.06) 2866.35,2790.56 2899.61,2790.56 ccw(c2899.61,2801.06) 2899.61,2811.56 2866.35,2811.56 cw(c2866.35,2822.06) 2866.35,2832.56 2899.61,2832.56 ccw(c2899.61,2843.06) 2899.61,2853.56 2866.35,2853.56 cw(c2866.35,2864.06) 2866.35,2874.56 2899.61,2874.56 ccw(c2899.61,2885.06) 2899.61,2895.56 2866.35,2895.56 cw(c2866.35,2906.06) 2866.35,2916.56 2899.61,2916.56 ccw(c2899.61,2927.06) 2899.61,2937.56 2866.35,2937.56 cw(c2866.35,2948.06) 2866.35,2958.56 2899.61,2958.56 ccw(c2899.61,2969.06) 2899.61,2979.56 2866.35,2979.56 cw(c2866.35,2990.06) 2866.35,3000.56 2899.61,3000.56 ccw(c2899.61,3011.06) 2899.61,3021.56 2866.35,3021.56 cw(c2866.35,3032.06) 2866.35,3042.56 2880.2,3042.56 ccw(c2880.2,3053.06) 2890.7,3053.06 2890.7,3095.68 2890.7,3159.35 2923.23,3191.88 3001.83,3191.88 P12.4@3049.61,3144.09
  Layer 2 w6: v1(2708.53,1995.08) 2831.79,1995.08 2851.28,2014.56 2851.28,2115.08 2889.41,2153.21 v1(2928.87,2153.21)
DVP_SDA: P12.6 R74.1 | length 3031.2
  Top Layer w6: R74.1@2822.18,2049.09 2823.32,2047.95 v1(2823.32,2029.54) ; v1(2970.01,2174.75) 2970.01,2193.09 2970.01,2196.09 ccw(c2959.51,2196.09) 2959.51,2206.59 2950.37,2206.59 cw(c2950.37,2217.09) 2950.37,2227.59 2973.43,2227.59 ccw(c2973.43,2238.09) 2973.43,2248.59 2946.1,2248.59 cw(c2946.1,2259.09) 2946.1,2269.59 2973.43,2269.59 ccw(c2973.43,2280.09) 2973.43,2290.59 2940.13,2290.59 cw(c2940.13,2301.09) 2940.13,2311.59 2973.43,2311.59 ccw(c2973.43,2322.09) 2973.43,2332.59 2940.13,2332.59 cw(c2940.13,2343.09) 2940.13,2353.59 2973.43,2353.59 ccw(c2973.43,2364.09) 2973.43,2374.59 2940.13,2374.59 cw(c2940.13,2385.09) 2940.13,2395.59 2973.43,2395.59 ccw(c2973.43,2406.09) 2973.43,2416.59 2940.13,2416.59 cw(c2940.13,2427.09) 2940.13,2437.59 2973.43,2437.59 ccw(c2973.43,2448.09) 2973.43,2458.59 2940.13,2458.59 cw(c2940.13,2469.09) 2940.13,2479.59 2973.43,2479.59 ccw(c2973.43,2490.09) 2973.43,2500.59 2940.13,2500.59 cw(c2940.13,2511.09) 2940.13,2521.59 2973.43,2521.59 ccw(c2973.43,2532.09) 2973.43,2542.59 2940.13,2542.59 cw(c2940.13,2553.09) 2940.13,2563.59 2973.43,2563.59 ccw(c2973.43,2574.09) 2973.43,2584.59 2940.13,2584.59 cw(c2940.13,2595.09) 2940.13,2605.59 2973.43,2605.59 ccw(c2973.43,2616.09) 2973.43,2626.59 2940.13,2626.59 cw(c2940.13,2637.09) 2940.13,2647.59 2973.43,2647.59 ccw(c2973.43,2658.09) 2973.43,2668.59 2940.13,2668.59 cw(c2940.13,2679.09) 2940.13,2689.59 2973.43,2689.59 ccw(c2973.43,2700.09) 2973.43,2710.59 2940.13,2710.59 cw(c2940.13,2721.09) 2940.13,2731.59 2973.43,2731.59 ccw(c2973.43,2742.09) 2973.43,2752.59 2940.13,2752.59 cw(c2940.13,2763.09) 2940.13,2773.59 2973.43,2773.59 ccw(c2973.43,2784.09) 2973.43,2794.59 2940.13,2794.59 cw(c2940.13,2805.09) 2940.13,2815.59 2973.43,2815.59 ccw(c2973.43,2826.09) 2973.43,2836.59 2940.13,2836.59 cw(c2940.13,2847.09) 2940.13,2857.59 2973.43,2857.59 ccw(c2973.43,2868.09) 2973.43,2878.59 2940.13,2878.59 cw(c2940.13,2889.09) 2940.13,2899.59 2973.43,2899.59 ccw(c2973.43,2910.09) 2973.43,2920.59 2940.13,2920.59 cw(c2940.13,2931.09) 2940.13,2941.59 2973.43,2941.59 ccw(c2973.43,2952.09) 2973.43,2962.59 2940.13,2962.59 cw(c2940.13,2973.09) 2940.13,2983.59 2959.51,2983.59 ccw(c2959.51,2994.09) 2970.01,2994.09 2970.01,3024.82 2970.01,3046.15 3019.56,3095.7 3101.21,3095.7 P12.6@3149.61,3144.09
  Layer 2 w6: v1(2823.32,2029.54) 2823.32,2118.93 2879.14,2174.75 v1(2970.01,2174.75)
DVP_VSYNC: P12.3 R79.1 | length 3002.6
  Top Layer w6: R79.1@2714.9,1082.95 2715.78,1083.83 v1(2715.78,1108.66) ; v1(3001.96,3034.93) 3002.32,3034.57 3002.32,2250.8 3002.32,2190.77 ccw(c3012.82,2190.77) 3012.82,2180.27 3030.32,2180.27 cw(c3030.32,2169.77) 3030.32,2159.27 2990.22,2159.27 ccw(c2990.22,2148.77) 2990.22,2138.27 3030.32,2138.27 cw(c3030.32,2127.77) 3030.32,2117.27 2990.22,2117.27 ccw(c2990.22,2106.77) 2990.22,2096.27 2991.82,2096.27 cw(c2991.82,2085.77) 3002.32,2085.77 3002.32,2082.77 3002.32,2071.05 3020.65,2052.72 3045.07,2052.72 v1(3045.34,2053)
  Layer 2 w6: v1(2715.78,1108.66) 2740.25,1108.66 2864.89,1233.3 2954.84,1233.3 3020.78,1299.25 3020.78,1518.53 3000.01,1539.3 3000.01,1620.3 3045.01,1665.3 3045.01,1676.33 3045.01,1679.33 3045.01,1698.33 cw(c3054.51,1698.33) 3054.51,1707.83 3080.51,1707.83 ccw(c3080.51,1717.33) 3080.51,1726.83 3054.51,1726.83 cw(c3054.51,1736.33) 3054.51,1745.83 3080.51,1745.83 ccw(c3080.51,1755.33) 3080.51,1764.83 3054.51,1764.83 cw(c3054.51,1774.33) 3054.51,1783.83 3080.51,1783.83 ccw(c3080.51,1793.33) 3080.51,1802.83 3054.51,1802.83 cw(c3054.51,1812.33) 3054.51,1821.83 3080.51,1821.83 ccw(c3080.51,1831.33) 3080.51,1840.83 3054.51,1840.83 cw(c3054.51,1850.33) 3054.51,1859.83 3080.51,1859.83 ccw(c3080.51,1869.33) 3080.51,1878.83 3054.51,1878.83 cw(c3054.51,1888.33) 3045.01,1888.33 3045.01,1901.39 3045.01,1904.39 3045.01,2052.67 v1(3045.34,2053)
  Bottom Layer w6: v1(3001.96,3034.93) 3001.96,3196.44 P12.3@3049.61,3244.09
ELED0: P1.1 P13.11 R10.1 | length 4301.4
  Top Layer w8: v1(1883.04,1591.26) 1883.04,1714.83 1920.92,1752.71 R10.1@2029.03,1752.71
  Bottom Layer w8: v1(1883.04,1591.26) 1883.04,1321.79 2242.77,962.06 3272.26,962.06 3452.12,782.2 3452.12,361.17 3486.53,326.76 3960.61,326.76 P13.11@4047.36,240 4099.13,188.23 4353.7,188.23 4678.46,513 P1.1@4779,513
ELED1: P1.4 P13.10 R12.1 | length 4721.5
  Top Layer w8: v1(1859.86,1561.67) 1860.64,1560.9 1884.72,1560.9 1917.32,1593.5 1917.32,1693.42 1926.61,1702.71 R12.1@2029.03,1702.71
  Bottom Layer w8: v1(1859.86,1561.67) 1859.86,1318.08 2241.27,936.68 2873.42,936.68 2915.7,894.4 3277.24,894.4 3415.36,756.27 3415.36,367.67 3486.16,296.87 3668.84,296.87 P13.10@3725.71,240 3806,159.71 4371.31,159.71 4661.78,450.18 4819.81,450.18 4848.48,478.85 4848.48,743.52 P1.4@4779,813
eMMC_CLK: R41.1 U10.M6 | length 1364.4
  Top Layer w6: v1(1192.93,1014.38) 1193.56,1013.74 1193.56,996.48 U10.M6@1194.2,995.85 ; v1(1995.57,987.1) 2024.49,1016.02 R41.1@2268.97,1016.02
  Bottom Layer w6: v1(1192.93,1014.38) 1208.28,1014.38 1227.28,1014.38 cw(c1227.28,1006.38) 1235.28,1006.38 1235.28,996.57 ccw(c1243.28,996.57) 1251.28,996.57 1251.28,1017.97 cw(c1259.28,1017.97) 1267.28,1017.97 1267.28,996.57 ccw(c1275.28,996.57) 1283.28,996.57 1283.28,1017.97 cw(c1291.28,1017.97) 1299.28,1017.97 1299.28,996.57 ccw(c1307.28,996.57) 1315.28,996.57 1315.28,1017.97 cw(c1323.28,1017.97) 1331.28,1017.97 1331.28,1001.22 ccw(c1339.28,1001.22) 1347.28,1001.22 1347.28,1014.38 cw(c1355.28,1014.38) 1363.28,1014.38 1363.28,1006.38 ccw(c1371.28,1006.38) 1379.28,1006.38 cw(c1387.28,1006.38) 1387.28,1014.38 1400.48,1014.38 1406.4,1014.38 1433.68,987.1 v1(1995.57,987.1)
eMMC_CMD: R43.1 R105.1 U10.M5 | length 1395.9
  Top Layer w6: v1(1165.93,1015.71) 1165.93,1014.92 1174.52,1006.33 U10.M5@1174.52,995.85 ; v1(1513.98,969.24) 1531.62,969.24 R105.1@1535.64,973.26 ; v1(2022.02,966.08) 2313.03,966.08 2346.96,1000.01 R43.1@2346.96,1016.02
  Bottom Layer w6: v1(1165.93,1015.71) 1165.93,977.91 1174.59,969.24 1192.53,969.24 1363.33,969.24 cw(c1363.33,960.24) 1372.33,960.24 ccw(c1381.33,960.24) 1390.33,960.24 1390.33,964.03 cw(c1399.33,964.03) 1408.33,964.03 1408.33,959.28 ccw(c1417.33,959.28) 1426.33,959.28 1426.33,964.03 cw(c1435.33,964.03) 1444.33,964.03 1444.33,951.91 ccw(c1453.33,951.91) 1462.33,951.91 1462.33,960.24 cw(c1471.33,960.24) 1471.33,969.24 1474.33,969.24 v1(1513.98,969.24) 1516.23,967 1522.44,967 1523.36,966.08 v1(2022.02,966.08)
eMMC_DATA0: R21.1 R97.1 U10.A3 | length 1395.9
  Top Layer w6: v1(1123.44,1285.02) 1135.15,1273.32 U10.A3@1135.15,1212.38 ; v1(1513.98,1311.8) R97.1@1535.64,1311.8 ; v1(1591.58,1428.31) 1628.18,1464.91 1675.44,1464.91 1678.44,1464.91 ccw(c1678.44,1473.91) 1687.44,1473.91 1687.44,1476.16 cw(c1696.44,1476.16) 1705.44,1476.16 1705.44,1470.22 ccw(c1714.44,1470.22) 1723.44,1470.22 1723.44,1476.16 cw(c1732.44,1476.16) 1741.44,1476.16 1741.44,1470.22 ccw(c1750.44,1470.22) 1759.44,1470.22 1759.44,1470.96 cw(c1768.44,1470.96) 1777.44,1470.96 1777.44,1470.22 ccw(c1786.44,1470.22) 1795.44,1470.22 1795.44,1473.91 cw(c1804.44,1473.91) 1813.44,1473.91 ccw(c1822.44,1473.91) 1822.44,1464.91 1857.72,1464.91 1936.62,1464.91 1990.61,1518.91 2020.22,1518.91 2029.03,1527.72 R21.1@2029.03,1528.7
  Bottom Layer w6: v1(1123.44,1285.02) 1123.44,1285.49 1133.51,1295.57 1388.45,1295.57 1404.68,1311.8 1414.59,1311.8 1417.59,1311.8 ccw(c1417.59,1319.8) 1425.59,1319.8 1425.59,1331.78 cw(c1433.59,1331.78) 1441.59,1331.78 1441.59,1301.85 ccw(c1449.59,1301.85) 1457.59,1301.85 1457.59,1331.78 cw(c1465.59,1331.78) 1473.59,1331.78 1473.59,1319.8 ccw(c1481.59,1319.8) 1481.59,1311.8 1505.62,1311.8 v1(1513.98,1311.8) 1580.24,1311.8 1591.58,1323.14 v1(1591.58,1428.31)
eMMC_DATA1: R24.1 R98.1 U10.A4 | length 1385.9
  Top Layer w6: v1(1154.69,1273.69) 1154.76,1273.62 1154.76,1212.45 U10.A4@1154.83,1212.38 ; v1(1513.98,1263.44) R98.1@1535.64,1263.44 ; v1(1617.46,1407.42) 1654.17,1444.12 1959.78,1444.12 1998.28,1482.62 2027.5,1482.62 R24.1@2029.03,1481.08
  Bottom Layer w6: v1(1154.69,1273.69) 1341.77,1273.69 1352.03,1263.44 1366.02,1263.44 1369.02,1263.44 ccw(c1369.02,1271.44) 1377.02,1271.44 1377.02,1274.85 cw(c1385.02,1274.85) 1393.02,1274.85 1393.02,1242.39 ccw(c1401.02,1242.39) 1409.02,1242.39 1409.02,1274.85 cw(c1417.02,1274.85) 1425.02,1274.85 1425.02,1242.39 ccw(c1433.02,1242.39) 1441.02,1242.39 1441.02,1274.85 cw(c1449.02,1274.85) 1457.02,1274.85 1457.02,1242.39 ccw(c1465.02,1242.39) 1473.02,1242.39 1473.02,1271.77 cw(c1481.02,1271.77) 1489.02,1271.77 1489.02,1271.44 ccw(c1497.02,1271.44) 1497.02,1263.44 v1(1513.98,1263.44) 1583.46,1263.44 1617.46,1297.44 v1(1617.46,1407.42)
eMMC_DATA2: R34.1 R99.1 U10.A5 | length 1304.9
  Top Layer w6: v1(1173.94,1235.08) 1174.23,1234.8 1174.23,1212.67 U10.A5@1174.52,1212.38 ; v1(1509.21,1166.71) R99.1@1535.64,1166.71 ; v1(1766.61,1175.99) 2026.61,1175.99 R34.1@2029.03,1178.41
  Bottom Layer w6: v1(1173.94,1235.08) 1175.32,1236.47 1228.08,1236.47 1297.84,1166.71 v1(1509.21,1166.71) 1525.38,1166.71 1528.38,1166.71 ccw(c1528.38,1174.71) 1536.38,1174.71 1536.38,1179.23 cw(c1544.38,1179.23) 1552.38,1179.23 1552.38,1153.53 ccw(c1560.38,1153.53) 1568.38,1153.53 1568.38,1179.23 cw(c1576.38,1179.23) 1584.38,1179.23 1584.38,1153.53 ccw(c1592.38,1153.53) 1600.38,1153.53 1600.38,1179.23 cw(c1608.38,1179.23) 1616.38,1179.23 1616.38,1153.53 ccw(c1624.38,1153.53) 1632.38,1153.53 1632.38,1179.23 cw(c1640.38,1179.23) 1648.38,1179.23 1648.38,1153.53 ccw(c1656.38,1153.53) 1664.38,1153.53 1664.38,1179.23 cw(c1672.38,1179.23) 1680.38,1179.23 1680.38,1153.76 ccw(c1688.38,1153.76) 1696.38,1153.76 1696.38,1174.71 cw(c1704.38,1174.71) 1712.38,1174.71 ccw(c1720.38,1174.71) 1720.38,1166.71 1747,1166.71 1757.33,1166.71 v1(1766.61,1175.99)
eMMC_DATA3: R38.1 R100.1 U10.B2 | length 1279.9
  Top Layer w6: v1(1063.72,1183.18) 1073.23,1192.7 U10.B2@1115.46,1192.7 ; v1@1506.63,1026.04 1531.23,1026.04 R100.1@1535.64,1021.62 ; v1(1930.85,1112.18) 2027.9,1112.18 R38.1@2029.03,1111.04
  Bottom Layer w6: v1(1063.72,1183.18) 1063.72,1124.93 1101.65,1087 1391.27,1087 1452.44,1025.83 v1(1506.42,1025.83) 1555.01,1025.83 1558.01,1025.83 ccw(c1558.01,1034.83) 1567.01,1034.83 1567.01,1039.54 cw(c1576.01,1039.54) 1585.01,1039.54 1585.01,1029.79 ccw(c1594.01,1029.79) 1603.01,1029.79 1603.01,1035.51 cw(c1612.01,1035.51) 1621.01,1035.51 1621.01,1029.79 ccw(c1630.01,1029.79) 1639.01,1029.79 1639.01,1034.83 cw(c1648.01,1034.83) 1657.01,1034.83 ccw(c1666.01,1034.83) 1666.01,1025.83 1792.51,1025.83 1844.5,1025.83 v1(1930.85,1112.18)
eMMC_DATA4: R26.1 R101.1 U10.B3 | length 1330.9
  Top Layer w6: v1(1112.9,1252.94) 1112.9,1214.94 U10.B3@1135.15,1192.7 ; v1(1509.74,1215.07) R101.1@1535.64,1215.07 ; v1(1764.52,1305.65) 2028.42,1305.65 R26.1@2029.03,1305.04
  Bottom Layer w6: v1(1112.9,1252.94) 1264.73,1252.94 1302.59,1215.07 1303.01,1215.07 1322.01,1215.07 cw(c1322.01,1207.07) 1330.01,1207.07 1330.01,1196.95 ccw(c1338.01,1196.95) 1346.01,1196.95 1346.01,1222.71 cw(c1354.01,1222.71) 1362.01,1222.71 1362.01,1196.95 ccw(c1370.01,1196.95) 1378.01,1196.95 1378.01,1216.03 cw(c1386.01,1216.03) 1394.01,1216.03 1394.01,1196.95 ccw(c1402.01,1196.95) 1410.01,1196.95 1410.01,1216.03 cw(c1418.01,1216.03) 1426.01,1216.03 1426.01,1196.95 ccw(c1434.01,1196.95) 1442.01,1196.95 1442.01,1216.03 cw(c1450.01,1216.03) 1458.01,1216.03 1458.01,1202.75 ccw(c1466.01,1202.75) 1474.01,1202.75 1474.01,1207.07 cw(c1482.01,1207.07) 1482.01,1215.07 1495.91,1215.07 v1(1509.74,1215.07) 1585.34,1215.07 1675.91,1305.65 v1(1764.52,1305.65)
eMMC_DATA5: R30.1 R102.1 U10.B4 | length 1329.9
  Top Layer w6: v1(1134.67,1157.98) 1134.67,1172.53 U10.B4@1154.83,1192.7 ; v1(1506.65,1069.99) R102.1@1535.64,1069.99 ; v1(1834.18,1209.77) 1873.59,1249.17 2028.81,1249.17 R30.1@2029.03,1249.4
  Bottom Layer w6: v1(1134.67,1157.98) 1152.49,1140.16 1167.05,1140.16 1179.58,1127.63 1449.02,1127.63 v1(1506.65,1069.99) 1528.1,1069.99 1531.1,1069.99 ccw(c1531.1,1077.99) 1539.1,1077.99 1539.1,1081.54 cw(c1547.1,1081.54) 1555.1,1081.54 1555.1,1067.52 ccw(c1563.1,1067.52) 1571.1,1067.52 1571.1,1081.54 cw(c1579.1,1081.54) 1587.1,1081.54 1587.1,1067.52 ccw(c1595.1,1067.52) 1603.1,1067.52 1603.1,1081.54 cw(c1611.1,1081.54) 1619.1,1081.54 1619.1,1067.52 ccw(c1627.1,1067.52) 1635.1,1067.52 1635.1,1081.54 cw(c1643.1,1081.54) 1651.1,1081.54 1651.1,1069.8 ccw(c1659.1,1069.8) 1667.1,1069.8 1667.1,1077.99 cw(c1675.1,1077.99) 1683.1,1077.99 ccw(c1691.1,1077.99) 1691.1,1069.99 1766.65,1069.99 1786.3,1069.99 1834.18,1117.87 v1(1834.18,1209.77)
eMMC_DATA6: R14.1 R103.1 U10.B5 | length 1351.3
  Top Layer w6: U10.B5@1174.52,1192.7 1174.52,1164.55 1178.61,1160.46 v1(1178.61,1157.29) ; v1(1513.98,1118.35) R103.1@1535.64,1118.35 ; v1(1805.65,1528.72) 1878.49,1528.72 1992.48,1642.71 R14.1@2029.03,1642.71
  Bottom Layer w6: v1(1178.61,1157.29) 1191.76,1144.13 1195.4,1140.5 1491.83,1140.5 v1(1513.98,1118.35) 1750.66,1118.35 1806.34,1174.03 1806.34,1528.02 v1(1805.65,1528.72)
eMMC_DATA7: R18.1 R104.1 U10.B6 | length 1355.3
  Top Layer w6: U10.B6@1194.2,1192.7 1211.52,1192.7 1218.95,1200.12 1218.95,1313.4 v1(1216.75,1315.6) ; v1(1513.98,1360.16) R104.1@1535.64,1360.16 1535.64,1408.23 1629.55,1502.14 1923.94,1502.14 2001.2,1579.4 2027.35,1579.4 R18.1@2029.03,1577.71
  Bottom Layer w6: v1(1216.75,1315.6) 1228.12,1315.6 1231.12,1315.6 ccw(c1231.12,1323.6) 1239.12,1323.6 1239.12,1340.88 cw(c1247.12,1340.88) 1255.12,1340.88 1255.12,1314.57 ccw(c1263.12,1314.57) 1271.12,1314.57 1271.12,1340.88 cw(c1279.12,1340.88) 1287.12,1340.88 1287.12,1314.57 ccw(c1295.12,1314.57) 1303.12,1314.57 1303.12,1340.88 cw(c1311.12,1340.88) 1319.12,1340.88 1319.12,1314.57 ccw(c1327.12,1314.57) 1335.12,1314.57 1335.12,1338.45 cw(c1343.12,1338.45) 1351.12,1338.45 1351.12,1323.6 ccw(c1359.12,1323.6) 1359.12,1315.6 1373.93,1315.6 1380.49,1315.6 1425.05,1360.16 v1(1513.98,1360.16)
eMMC_DQS: R45.1 R107.1 U10.H5 | length 1612.4
  Top Layer w6: R107.1@945.81,1067.35 v1(1012.35,1067.35) ; v1(1153.63,1063.79) 1155.87,1066.03 1165.96,1066.03 U10.H5@1174.52,1074.59 ; v1(2120.37,947.5) 2388.22,947.5 2424.94,984.22 R45.1@2424.94,1016.02
  Bottom Layer w6: v1(1012.35,1067.35) 1014.13,1065.57 1151.85,1065.57 v1(1153.63,1063.79) 1165.36,1075.52 1379.89,1075.52 1450.12,1005.28 2065.17,1005.28 2120.37,950.08 v1(2120.37,947.5)